# Altium PCB Copy of PCB1.PcbDoc
Units mm, origin at the board's own origin, x right, y up, seen from the top; angles counter-clockwise.
Board outline 86.99 x 34.04 mm, 2 copper layers (Top Layer, Ground Plane), stack 1.671 mm thick; 6 components, 6 nets, 10 pads, 0 vias.
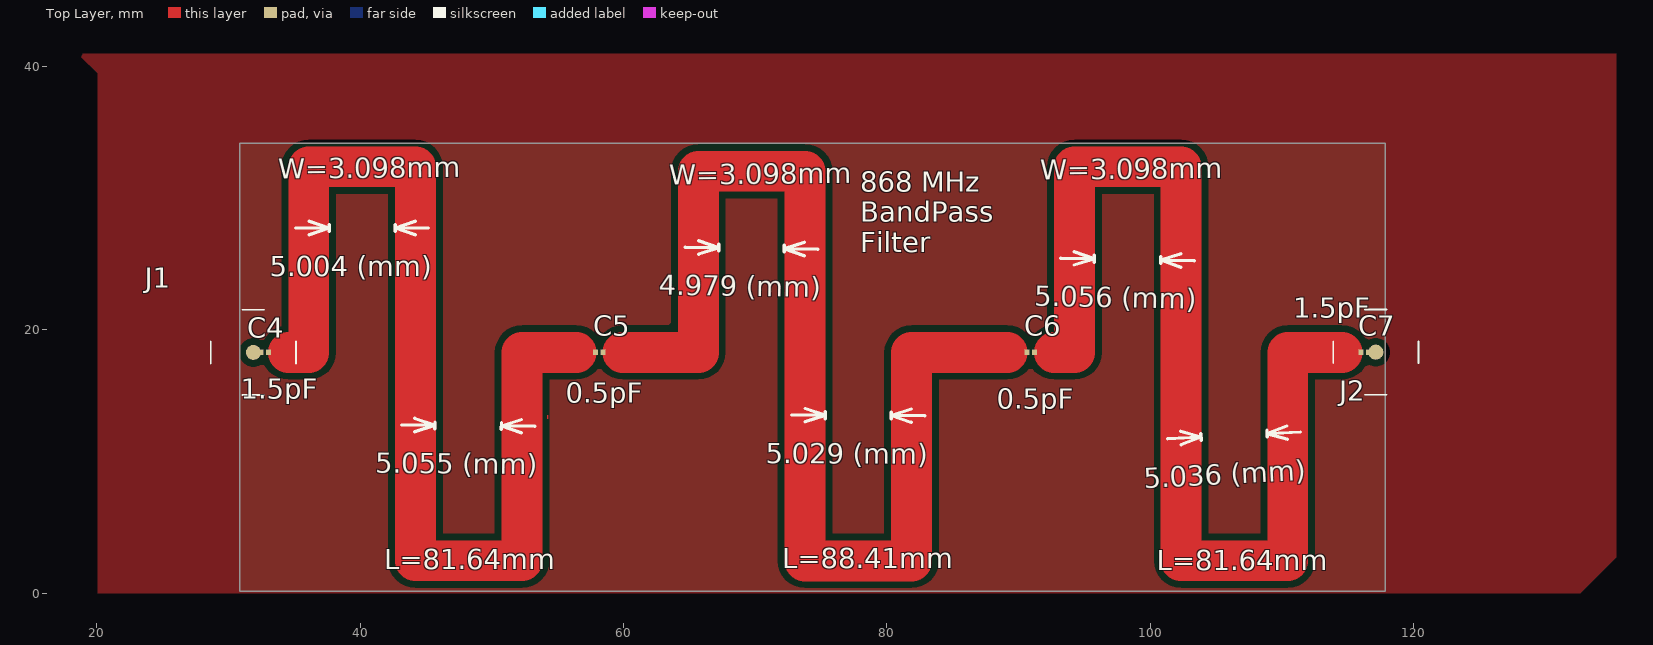
[diagram p0: Top Layer view]
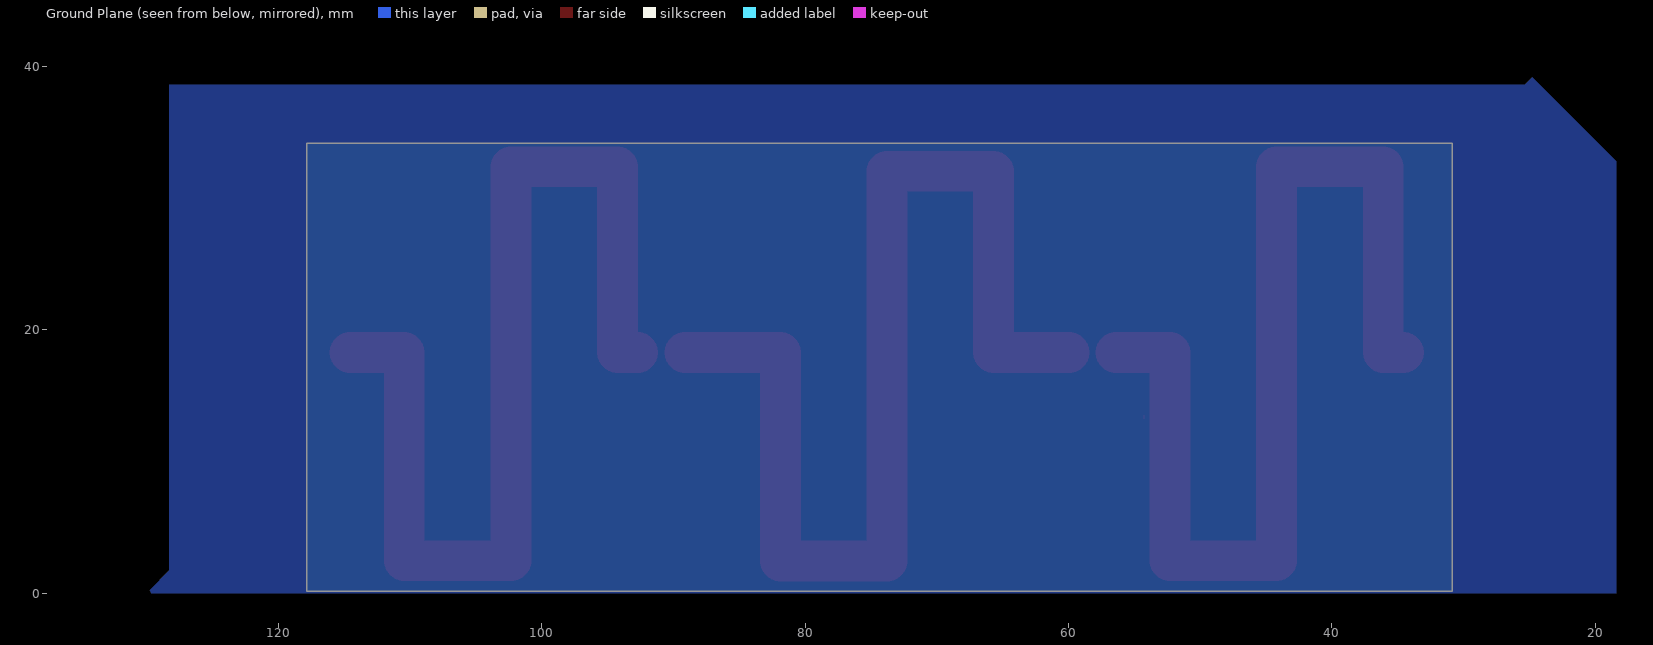
[diagram p1: Ground Plane view, seen from below]

## Layer stack, top to bottom
Top Solder: solder mask 0.0102, Solder Resist, Dk 3.5
Top Layer: signal copper 0.0356
Dielectric 1: dielectric 1.6, FR-4, Dk 4.3
Ground Plane: signal copper 0.0356
Bottom Solder: solder mask 0.0102, Solder Resist, Dk 3.5

## Board outline
30.861,0.127 30.861,34.163 117.856,34.163 117.856,0.127

## Design rules (kind name [scope] priority, off if disabled: settings)
Clearance RF_Clearance [InNetClass('RF_Traces')] p1: gap=0.5 ignorepadtopadclearanceinfootprint=TRUE
Clearance RF_Trace_Clerance [InNet('RF')] p2: gap=0.5 ignorepadtopadclearanceinfootprint=TRUE
Clearance [All] p3: gap=0.254 ignorepadtopadclearanceinfootprint=TRUE
PolygonConnect [All] p1: connectstyle=Relief reliefconductorwidth=0.254 reliefentries=4 polygonreliefangle="90 Angle" airgapwidth=0.254
RoutingVias [All] p1: holewidth=0.711 width=1.27 viastyle="Through Hole" minholewidth=0.711 minwidth=1.27 maxholewidth=0.711 maxwidth=1.27
SolderMaskExpansion [All] p1: expansion=0 istentingtop=FALSE
SupplyNets "Schematic Supply Nets" [InNet('GND')] p1: voltage=0.000
Width RF [All] p1: maxlimit=3.1 minlimit=0.254 preferedwidth=3.098 bottomlayer_maxwidth=0.254 bottomlayer_prefwidth=0.254 minimp=50.000000 maximp=50.000000 favimp=50.000000
Width [All] p2: maxlimit=0.254 minlimit=0.254 preferedwidth=0.254
30 further rules are at their usual default settings.

## Classes and differential pairs
net class RF_Traces: NetC4_1 NetC4_2 NetC5_2 NetC6_2 NetC7_2

## Components (designator, comment, footprint, x,y, rotation, side; value= is the part's Value field where it differs from the comment)
C4 "1.5pF" CAPC0603X33N 32.739,18.288 r0 top value=1,5pF
C5 "0.5pF" CAPC0603X33N 58.166,18.288 r0 top value=0,5pF
C6 "0.5pF" CAPC0603X33N 90.932,18.288 r0 top value=0,5pF
C7 "1.5pF" CAPC0603X33N 116.305,18.288 r0 top value=1,5pF
J1 "2081156-1_1" "TE_2081156-1 - duplicate" 31.877,18.288 r270 top
J2 "2081156-1_1" "TE_2081156-1 - duplicate" 117.145,18.301 r90 top

## Footprints (in the part's own frame and the unit in brackets; to place one, negate y for a bottom-side part, rotate by r counter-clockwise, add the part's x,y. Pads: shape width x height; smd on the part's side, far side on the other; paste and mask are expansions set on the pad)
CAPC0603X33N [mm]
  rect 0.38x0.4 smd: 1(-0.281,0) 2(0.281,0)
  body extent -0.3,-0.15 0.3,0.15, height 0.33
"TE_2081156-1 - duplicate" [mm]
  round 1.15 smd: 1(0,0)
  silkscreen extent -3.24,-3.24 3.24,3.24, body extent -3.18,-8.52 3.18,2.23, height 3.81

## Part data
C4 C7: library part C0603X5R1A104M030BC, "Cap Ceramic 1,5pF 0603", Package="0603 Taiyo Yuden", Check_prices=https://www.snapeda.com/parts/C0603X5R1A104M030BC/TDK/view-part/?ref=eda, MF=TDK, MP=C0603X5R1A104M030BC, SnapEDA_Link=https://www.snapeda.com/parts/C0603X5R1A104M030BC/TDK/view-part/?ref=snap
C5 C6: library part "0.5pF Cap 0603", "Cap Ceramic 0,5pF 0603", Package="0603 Taiyo Yuden", Check_prices=https://www.snapeda.com/parts/C0603X5R1A104M030BC/TDK/view-part/?ref=eda, MF=TDK, MP=C0603X5R1A104M030BC, SnapEDA_Link=https://www.snapeda.com/parts/C0603X5R1A104M030BC/TDK/view-part/?ref=snap
J1 J2: "SMA Connector Jack, Female Socket 50 Ohms Through Hole Solder", Package=None, Check_prices=https://www.snapeda.com/parts/2081156-1/TE+Connectivity+AMP+Connectors/view-part/?ref=eda, MF="TE Connectivity", MP=2081156-1, SnapEDA_Link=https://www.snapeda.com/parts/2081156-1/TE+Connectivity+AMP+Connectors/view-part/?ref=snap

## Nets (pads, with @x,y where several pads share a name; then routed paths per layer and width w, separated by ;. In a path a pad name is that pad's centre, name@x,y a point inside that pad or via, vN(x,y) a via of type N, cw(c..) or ccw(c..) an arc to the next point about the centre after c; other vN are vias at no path point)
GND: 
NetC4_1: C4.1 J1.1
NetC4_2: C4.2 C5.1 | length 81.7
  Top Layer w3.098: 34.544,18.288 36.093,18.288 36.093,32.386 44.191,32.386 44.191,2.461 52.289,2.461 52.289,18.288 54.853,18.288 56.388,18.288 56.402,18.288
NetC5_2: C5.2 C6.1 | length 88.4
  Top Layer w3.098: 59.944,18.288 64.135,18.288 65.684,18.288 65.684,32.051 73.782,32.051 73.782,2.45 81.88,2.45 81.88,18.288 87.69,18.288 89.154,18.288
NetC6_2: C6.2 C7.1 | length 81.7
  Top Layer w3.098: 92.71,18.288 94.259,18.288 94.259,32.386 102.357,32.386 102.357,2.461 110.455,2.461 110.455,18.288 113.019,18.288 114.554,18.288 114.568,18.288
NetC7_2: C7.2 J2.1

## Polygon pours and split planes (outlines as drawn)
GND on Ground Plane "GND_L02_P000" (solid, pour order 0): 25.324,38.633 128.295,38.633 128.295,1.727 130.023,0 18.39,0 18.39,32.817 24.816,39.243 24.613,39.446 24.511,39.446 24.536,39.421
no net on Top Layer "NONET_L01_P001" (solid, pour order 1): 16.866,42.85 18.745,40.97 135.407,40.97 135.407,2.718 132.69,0 20.041,0 20.041,39.497 16.967,42.57

## Other copper
Top Layer:
  text "'" at 54.077,12.395 h1.52

## Silkscreen, mask and mechanical layers (free items; w line width, h text height)
Top Overlay:
  lines w0.254: 35.103,27.737 37.643,27.737 ; 36.119,27.229 37.643,27.737 ; 36.119,28.245 37.643,27.737 ; 37.643,27.483 37.643,27.991 ; 42.647,27.483 42.647,27.991 ; 43.129,12.776 45.669,12.751 ; 44.14,12.258 45.669,12.751 ; 44.15,13.274 45.669,12.751 ; 44.171,27.229 42.647,27.737 ; 44.171,28.245 42.647,27.737 ; 45.187,27.737 42.647,27.737 ; 45.667,12.497 45.672,13.005 ; 50.721,12.446 50.726,12.954 ; 52.243,12.177 50.724,12.7 ; 52.253,13.193 50.724,12.7 ; 53.264,12.674 50.724,12.7 ; 64.694,26.277 67.234,26.238 ; 65.702,25.754 67.234,26.238 ; 65.718,26.769 67.234,26.238 ; 67.23,25.984 67.238,26.492 ; 72.208,25.908 72.216,26.416 ; 72.771,13.526 75.311,13.513 ; 73.728,25.631 72.212,26.162 ; 73.744,26.647 72.212,26.162 ; 73.784,13.013 75.311,13.513 ; 73.79,14.028 75.311,13.513 ; 74.752,26.123 72.212,26.162 ; 75.31,13.259 75.312,13.767 ; 80.339,13.233 80.341,13.741 ; 81.862,12.972 80.34,13.487 ; 81.867,13.988 80.34,13.487 ; 82.88,13.475 80.34,13.487 ; 93.219,25.451 95.758,25.4 ; 94.224,24.923 95.758,25.4 ; 94.245,25.939 95.758,25.4 ; 95.753,25.146 95.763,25.654 ; 100.807,25.044 100.818,25.552 ; 101.324,11.734 103.861,11.862 ; 102.313,12.292 103.861,11.862 ; 102.326,24.76 100.813,25.298 ; 102.347,25.776 100.813,25.298 ; 102.364,11.278 103.861,11.862 ; 103.352,25.247 100.813,25.298 ; 103.848,12.115 103.873,11.608 ; 108.877,12.369 108.903,11.862 ; 110.386,12.7 108.89,12.116 ; 110.437,11.685 108.89,12.116 ; 111.427,12.244 108.89,12.116
  text "W=3.098mm" at 33.757,31.471 h1.52 r0.52
  text "W=3.098mm" at 91.643,31.42 h1.52 r0.52
  text "W=3.098mm" at 63.475,31.013 h1.52 r0.52
  text "868 MHz  / BandPass  / Filter" at 77.978,25.908 h1.52
  text "5.004 (mm)" at 33.137,24.08 h1.52
  text "4.979 (mm)" at 62.66,22.651 h1.52 r359.12
  text "5.056 (mm)" at 91.205,21.834 h1.52 r358.85
  text "1.5pF" at 110.871,20.93 h1.52
  text "1.5pF" at 30.937,14.783 h1.52
  text "0.5pF" at 55.601,14.478 h1.52
  text "0.5pF" at 88.367,14.021 h1.52
  text "5.029 (mm)" at 70.799,9.879 h1.52 r359.71
  text "5.055 (mm)" at 41.152,9.139 h1.52 r359.42
  text "5.036 (mm)" at 99.56,7.983 h1.52 r2.89
  text "L=88.41mm" at 72.06,1.88 h1.52
  text "L=81.64mm" at 41.834,1.829 h1.52
  text "L=81.64mm" at 100.508,1.753 h1.52